# Altium PCB Ellis Huber Wearable device_IMU.PcbDoc
Units mm, origin at the board's own origin, x right, y up, seen from the top; angles counter-clockwise.
Board outline 22.5 x 12.5 mm, 4 copper layers (Top Layer, Ground, Power, Bottom Layer), stack 1.586 mm thick; 29 components, 22 nets, 78 pads, 26 vias.
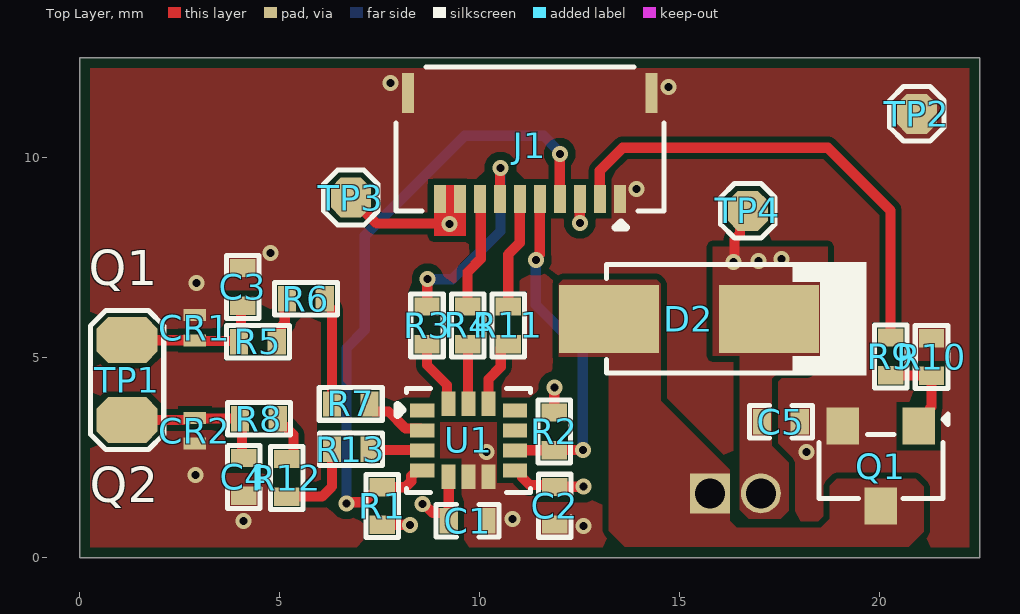
[diagram p0: Top Layer view]
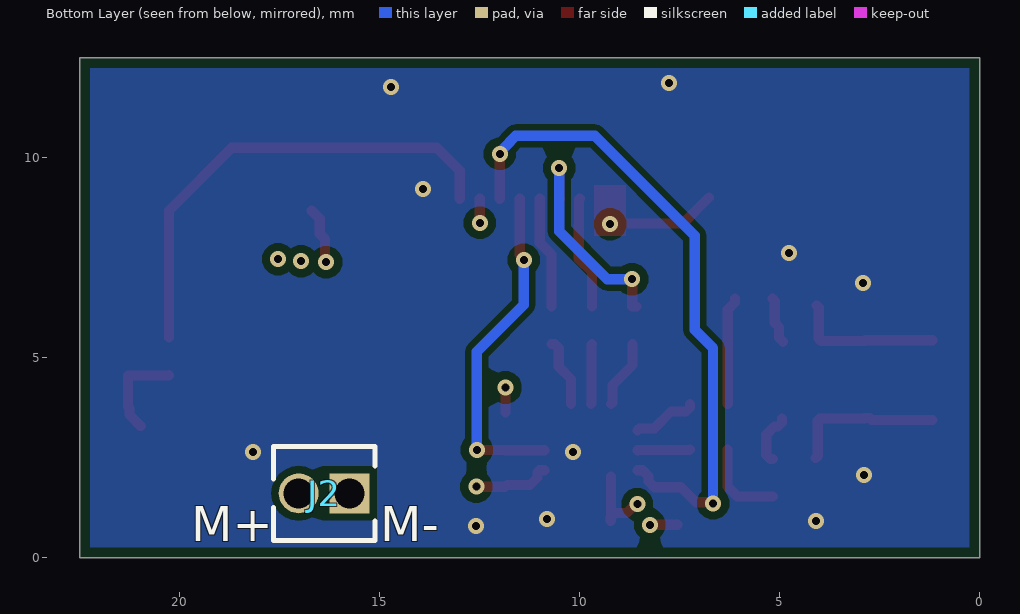
[diagram p1: Bottom Layer view, seen from below]
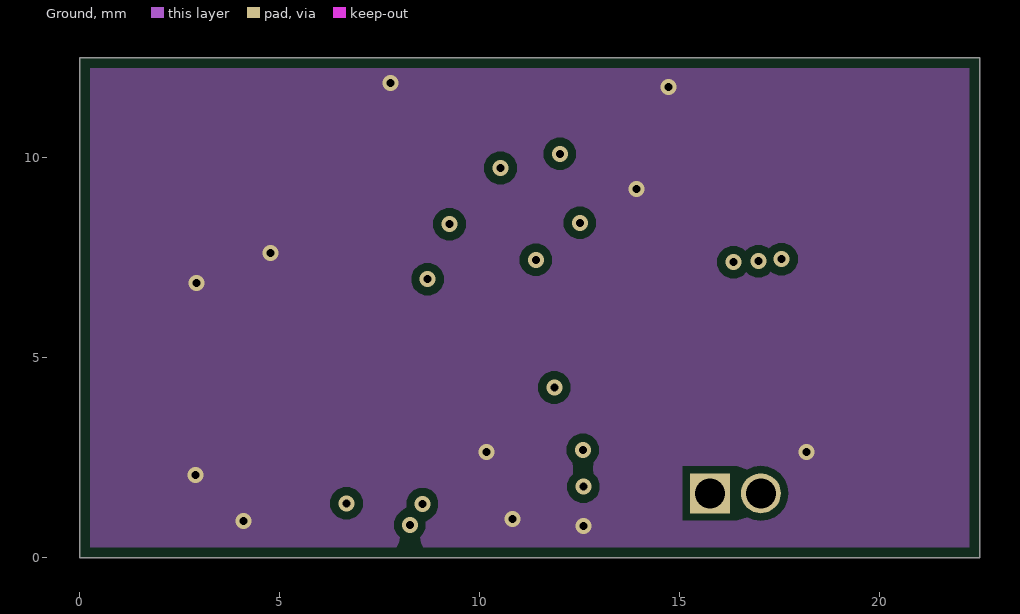
[diagram p2: Ground]
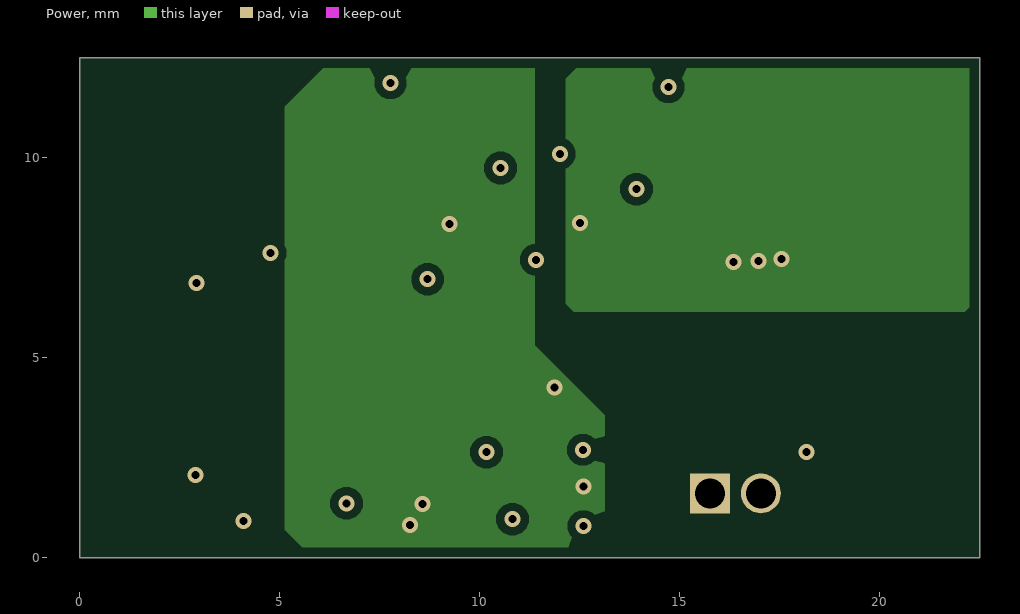
[diagram p3: Power]
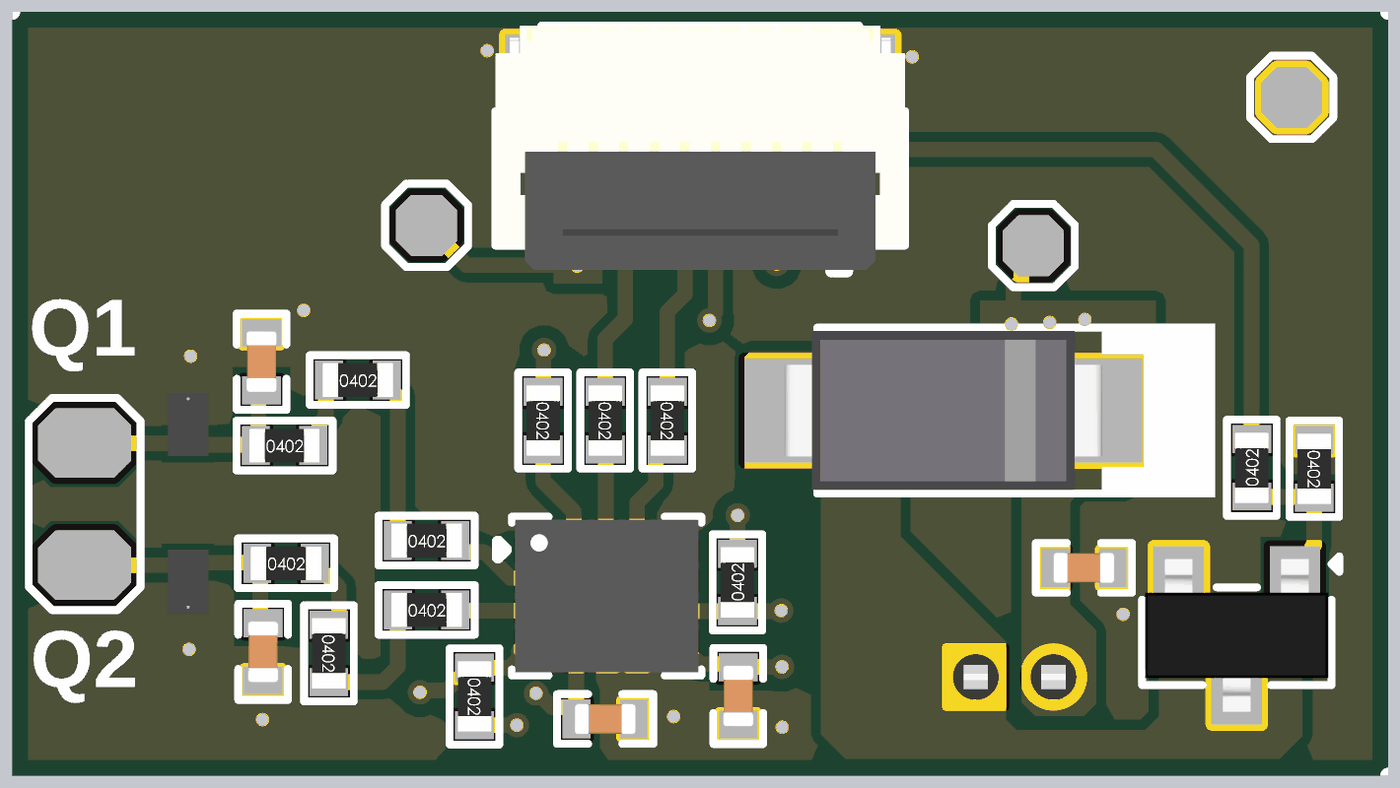
[diagram p4: 3D render of the assembled board from above, using the file's embedded part models]

## Layer stack, top to bottom
Top Solder: solder mask 0.0102, Solder Resist, Dk 3.5
Top Layer: signal copper 0.035
Dielectric 2: prepreg 0.2104, PP-006, Dk 4.4
Ground: signal copper 0.0152
Dielectric 1: dielectric 1.065, FR-4, Dk 4.6
Power: signal copper 0.0152
Dielectric 3: prepreg 0.2104, PP-006, Dk 4.4
Bottom Layer: signal copper 0.035
Bottom Solder: solder mask 0.0102, Solder Resist, Dk 3.5

## Board outline
0,0 0,12.5 22.5,12.5 22.5,0

## Design rules (kind name [scope] priority, off if disabled: settings)
BoardOutlineClearance [All] p1: gap=0 ignorepadtopadclearanceinfootprint=FALSE except(0.254: Fill-OutlineEdge Fill-CavityEdge Fill-CutoutEdge Fill-SplitBarrior Poly-OutlineEdge Poly-CavityEdge Poly-CutoutEdge Poly-SplitBarrior Region-OutlineEdge Region-CavityEdge Region-CutoutEdge Region-SplitBarrior)
Clearance [All] p1: gap=0.254 ignorepadtopadclearanceinfootprint=FALSE except(0: Arc-Hole Track-Hole SMDPad-Hole THPad-Hole Via-Hole Fill-Hole Poly-Hole Region-Hole Text-Hole; 0.127: Arc-SMDPad Arc-Text Track-SMDPad SMDPad-SMDPad SMDPad-Fill Via-Fill Region-Region Text-Text; 0.152: Arc-Arc Arc-Track Arc-Poly Track-Track Track-Poly SMDPad-Poly Fill-Poly Poly-Poly; 0.178: Arc-Via Arc-Region Track-Via Track-Fill SMDPad-Via THPad-Via THPad-Poly Via-Via; 0.203: Via-Poly)
MinimumSolderMaskSliver [All] p1: minsoldermaskwidth=0.025
PlaneConnect [All] p1: planeconnectstyle=Direct reliefexpansion=0.508 reliefentries=4 reliefconductorwidth=0.254 reliefairgap=0.254
PolygonConnect [All] p1: connectstyle=Direct reliefconductorwidth=0.254 reliefentries=4 polygonreliefangle="90 Angle" airgapwidth=0.254
RoutingVias [All] p1: holewidth=0.2 width=0.4 viastyle="Through Hole" minholewidth=0.2 minwidth=0.4 maxholewidth=0.2 maxwidth=0.4
SilkToSilkClearance [All] p1: silktosilkclearance=0
SilkToSolderMaskClearance [IsPad] p1: minsilkscreentomaskgap=0.003 clearancetoexposedcopper=TRUE
SolderMaskExpansion [All] p1: expansion=0.102 istentingtop=FALSE
SupplyNets "Schematic Supply Nets_2" [InNet('+3V3')] p1: voltage=0.000
SupplyNets "Schematic Supply Nets_1" [InNet('+3V3_M')] p2: voltage=0.000
SupplyNets "Schematic Supply Nets" [InNet('GND')] p3: voltage=0.000
Width [All] p1: maxlimit=0.254 minlimit=0.254 preferedwidth=0.254
26 further rules are at their usual default settings.

## Components (designator, comment, footprint, x,y, rotation, side; value= is the part's Value field where it differs from the comment)
C1 "0.1uF" Cap-0402 9.696,0.926 r0 top
C2 "0.1uF" Cap-0402 11.872,1.302 r270 top
C3 "100pF" Cap-0402 4.075,6.775 r270 top
C4 "100pF" Cap-0402 4.1,2.025 r90 top
C5 "0.1uF" Cap-0402 17.525,3.4 r180 top
CR1 "ESDALCL5-1BM2" CR_L5-1BM2_STM 2.875,5.75 r270 top
CR2 "ESDALCL5-1BM2" CR_L5-1BM2_STM 2.875,3.175 r90 top
D2 "SS24A" SMA 15.225,5.975 r180 top
J1 "503480-1000" 5034801000 11.25,10.3 r180 top
J2 "VL91022-160-320H" "HDR 1x2 Male 1.27mm" 16.392,1.612 r0 bottom
Q1 "AO3400A" sot-23 20.026,2.293 r180 top
R1 "10K" Res-0402 7.559,1.295 r270 top
R2 "10K" Res-0402 11.858,3.162 r90 top
R3 "0R" Res-0402 8.68,5.811 r270 top
R4 "0R" Res-0402 9.696,5.811 r270 top
R5 "200R" Res-0402 4.451,5.401 r0 top
R6 "200R" Res-0402 5.65,6.475 r0 top
R7 "100R" Res-0402 6.774,3.846 r0 top
R8 "200R" Res-0402 4.475,3.475 r0 top
R9 "100R" Res-0402 20.27,5.038 r90 top
R10 "100K" Res-0402 21.293,5.021 r270 top
R11 "0R" Res-0402 10.712,5.811 r270 top
R12 "200R" Res-0402 5.175,2 r270 top
R13 "100R" Res-0402 6.775,2.711 r0 top
TP1 "Qvar" "2 Test Pad" 1.183,3.444 r90 top
TP2 "TEST POINT 0.5mm Dia" "Test-point - 0.5mm" 20.925,11.1 r90 top
TP3 "TEST POINT 0.5mm Dia" "Test-point - 0.5mm" 6.775,9.007 r90 top
TP4 "TEST POINT 0.5mm Dia" "Test-point - 0.5mm" 16.7,8.675 r90 top
U1 "LSM6DSV16XTR" "14-LGA (2.5x3)" 9.719,2.938 r0 top

## Footprints (in the part's own frame and the unit in brackets; to place one, negate y for a bottom-side part, rotate by r counter-clockwise, add the part's x,y. Pads: shape width x height; smd on the part's side, far side on the other; paste and mask are expansions set on the pad)
"2 Test Pad" [mil]
  oct 45x60 smd: 1(0,0) 2(78.74,0)
  silkscreen extent -29,-36 108,36
"14-LGA (2.5x3)" [mm]
  rect 0.61x0.35 smd mask+0.05: 1(-1.16,0.75) 2(-1.16,0.25) 3(-1.16,-0.25) 4(-1.16,-0.75) 8(1.16,-0.75) 9(1.16,-0.25) 10(1.16,0.25) 11(1.16,0.75)
  rect 0.35x0.61 smd mask+0.05: 5(-0.5,-0.91) 6(0,-0.91) 7(0.5,-0.91) 12(0.5,0.91) 13(0,0.91) 14(-0.5,0.91)
  silkscreen extent -1.78,-1.3 1.55,1.3, body extent -1.5,-1.25 1.5,1.25, height 0.86
5034801000 [mm]
  rect 0.3x0.7 smd: 1(-2.25,1.325) 2(-1.75,1.325) 3(-1.25,1.325) 4(-0.75,1.325) 5(-0.25,1.325) 6(0.25,1.325) 7(0.75,1.325) 8(1.25,1.325) 9(1.75,1.325) 10(2.25,1.325)
  rect 0.3x1 smd: S1(-3.04,-1.325) S2(3.04,-1.325)
  silkscreen extent -3.35,-1.97 3.35,2.04, body extent -3.35,-1.98 3.35,2.02, height 1.02
Cap-0402 [mil]
  rect 18x25 smd mask+2.36: 1(-18.5,0) 2(18.5,0)
  silkscreen extent -31,-16 31,16, body extent -20,-10 20,10, height 19
CR_L5-1BM2_STM [mil]
  rect 12x22 smd paste+0 mask+0: 1(-12.5,0)
  rect 12x22 smd paste+0 mask-1: 2(12.5,0)
  body extent -21,-13 21,13, height 20
"HDR 1x2 Male 1.27mm" [mm]
  rect 1x1 hole 0.75 paste-2539.97 mask+0.051: 1(-0.635,0)
  round 1 hole 0.75 paste-2539.97 mask+0.051: 2(0.635,0)
  silkscreen extent -1.27,-1.18 1.27,1.18, body extent -1.27,-1.17 1.28,1.17, height 5.6
Res-0402 [mil]
  rect 18x25 smd mask+2.17: 1(-18.5,0) 2(18.5,0)
  silkscreen extent -32,-17 32,16, body extent -23,-11 23,11, height 16
SMA [mm]
  rect 2.5x1.7 smd: 1(-2,0) 2(2,0)
  silkscreen extent -4.45,-1.42 2.06,1.42, body extent -2.6,-1.3 2.6,1.3, height 2.4
sot-23 [mm] "TRANS NPN 40V 0.6A SOT23"
  rect 0.82x0.92 smd: 1(-0.95,-1) 2(0.95,-1) 3(0,1)
  silkscreen extent -1.68,-1.3 1.55,0.81, body extent -1.5,-1.25 1.5,1.25, height 1.05
"Test-point - 0.5mm" [mm]
  oct 1x1 smd: 1(0,0)
  silkscreen extent -0.68,-0.68 0.68,0.68

## Part data
C1 C2 C5: library part C1005X5R1H104K050BB, "CAP CER 0.1UF 50V X5R 0402", Capacitance=100nF, Case Code (Imperial)=0402, Case Code (Metric)=1005, Dielectric=X5R, Dielectric Material=Ceramic, LCSC Part Number=C2181865, Manufacturer=TDK, Max Operating Temperature=85°C, Min Operating Temperature=-55°C, Package Quantity=1, Supplier Part Number 1=445-5942-1-ND, Tolerance=10%, Voltage=50V, Case/Package=0402, ComponentLink1Description=https://product.tdk.com/info/en/catalog/spec/mlccspec_commercial_general_midvoltage_en.pdf?src-supplier=Digi-Key, ComponentLink1URL=https://product.tdk.com/info/en/catalog/spec/mlccspec_commercial_general_midvoltage_en.pdf?src-supplier=Digi-Key, ComponentLink2Description=http://www.tdk.co.jp/tefe02/e413_c.pdf?src-supplier=Future+Electronics, ComponentLink2URL=http://www.tdk.co.jp/tefe02/e413_c.pdf?src-supplier=Future+Electronics, ComponentLink3Description=https://www.verical.com/server-webapp/html/getDatasheet?partID=743571&src-supplier=Verical, ComponentLink3URL=https://www.verical.com/server-webapp/html/getDatasheet?partID=743571&src-supplier=Verical, ComponentLink4Description=http://www.tdk.co.jp/tefe02/e412_c.pdf?src-supplier=Avnet+Europe, ComponentLink4URL=http://www.tdk.co.jp/tefe02/e412_c.pdf?src-supplier=Avnet+Europe, Construction=Flat, Depth=0.5mm, Height=0.5mm, Item Type=Capacitor, Lead Free="Lead Free", Length=1mm, Manufacturer Part Number=C1005X5R1H104K050BB, Mount="Surface Mount", Packaging="Tape and Reel", Pricing 1="1=0.12, 10=0.09, 50=0.049, 100=0.04, 500=0.02858, 1000=0.02245, 2500=0.02041, 5000=0.01878 (USD)", Radiation Hardening=No, REACH SVHC="No SVHC", Resistor Type=Ceramic, RoHS Compliant=Yes, Series=C, Stock 1=1455182, Supplier 1=Digi-Key, Termination=SMD/SMT, Thickness=0.022inch, Voltage Rating=50V, Voltage Rating (DC)=50V, Weight=2.3E-05oz, Width=0.02inch
C3 C4: library part CC0402JRNPO9BN101, "CAP CER 100PF 50V C0G/NPO 0402", Case Code (Imperial)=0402, Case Code (Metric)=1005, Dielectric=C0G, Dielectric Material=Ceramic, Insulation Resistance=100GR, LCSC Part Number=C106200, Manufacturer=Yageo, Max Operating Temperature=125°C, Min Operating Temperature=-55°C, Package Quantity=1, Supplier Part Number=8934564, Temperature Coefficient=30ppm/°C, Tolerance=5%, Voltage=50V, Case/Package=0402, Category="Ceramic Capacitors", ComponentLink1Description=https://datasheet.ciiva.com/11786/0900766b80d84fbf-11786101.pdf?src-supplier=Rs, ComponentLink1URL=https://datasheet.ciiva.com/11786/0900766b80d84fbf-11786101.pdf?src-supplier=Rs, ComponentLink2Description=https://datasheet.ciiva.com/23767/25787-23767888.pdf?src-supplier=Newark, ComponentLink2URL=https://datasheet.ciiva.com/23767/25787-23767888.pdf?src-supplier=Newark, ComponentLink3Description=https://datasheet.ciiva.com/28450/1443161-28450220.pdf?src-supplier=Element14, ComponentLink3URL=https://datasheet.ciiva.com/28450/1443161-28450220.pdf?src-supplier=Element14, ComponentLink4Description=https://datasheet.ciiva.com/8033/1443161-8033598.pdf?src-supplier=Element14, ComponentLink4URL=https://datasheet.ciiva.com/8033/1443161-8033598.pdf?src-supplier=Element14, ComponentLink5Description=https://datasheet.ciiva.com/143/mlccorderingcode-143990.pdf?src-supplier=Digi-Key, ComponentLink5URL=https://datasheet.ciiva.com/143/mlccorderingcode-143990.pdf?src-supplier=Digi-Key, ComponentLink6Description=https://datasheet.ciiva.com/143/mlccorderingcode-143989.pdf?src-supplier=Digi-Key, ComponentLink6URL=https://datasheet.ciiva.com/143/mlccorderingcode-143989.pdf?src-supplier=Digi-Key, ComponentLink7Description=https://datasheet.ciiva.com/143/mlccorderingcode-143991.pdf?src-supplier=Digi-Key, ComponentLink7URL=https://datasheet.ciiva.com/143/mlccorderingcode-143991.pdf?src-supplier=Digi-Key, Depth=0.5mm, Height=0.5mm, Item Type=Capacitor, Lead Free="Lead Free", Length=1mm, Manufacturer Part Number=CC0402JRNPO9BN101, Mounting Technology="Surface Mount", Packaging="Tape and Reel", Pins=2, Pricing="10000=0.002, 40000=0.0019, 150000=0.0018, 400000=0.0018, 1000000=0.0017 (USD)", Radiation Hardening=No, Reach SVHC Compliant=No, RoHS=Yes, RoHS Compliant=Yes, Series=CC, Stock=11720000, Supplier="Future Electronics", Termination=SMD/SMT, Thickness=0.022inch, Voltage Rating=50V, Voltage Rating (DC)=50V, Width=0.02inch
CR1 CR2: "Single-line low capacitance and low leakage current ESD protection", Manufacturer_Name=STMicroelectronics, Copyright="Copyright (C) 2025 Ultra Librarian. All rights reserved.", Manufacturer_Part_Number=ESDALCL5-1BM2, RefDes=RefDes, Type=Type
D2: "40V 500mV@2A 2A SMA(DO-214AC) Schottky Barrier Diodes (SBD) ROHS", LCSC Part Number=C2886579, Manufacturer="Guangdong Hottech", Package=SMA(DO-214AC), ComponentLink1Description=LCSC, ComponentLink1URL=https://www.lcsc.com/product-detail/Schottky-Barrier-Diodes-SBD_Guangdong-Hottech-SS24A_C2886579.html, Manufacturer Part Number=SS24A
J1: "CONN FFC FPC 10POS 0.5MM R/A", Actuator Color=Black, Current Rating=500mA, Flammability Rating="UL94 V-0", Housing Color=White, Manufacturer=Molex, Max Operating Temperature=85°C, Max Voltage Rating (AC)=50V, Min Operating Temperature=-40°C, Package Quantity=3000, Supplier Part Number=538-503480-1000, Actuator Material=Nylon,Glass,Polyamide, ComponentLink1Description=https://datasheet.ciiva.com/26916/getdatasheetpartid-735332-26916946.pdf?src-supplier=Verical, ComponentLink1URL=https://datasheet.ciiva.com/26916/getdatasheetpartid-735332-26916946.pdf?src-supplier=Verical, ComponentLink2Description=https://datasheet.ciiva.com/5137/5034801000-ffc-fpc-connectors-179433-5137762.pdf?src-supplier=Mouser, ComponentLink2URL=https://datasheet.ciiva.com/5137/5034801000-ffc-fpc-connectors-179433-5137762.pdf?src-supplier=Mouser, ComponentLink3Description=https://datasheet.ciiva.com/671/5034801000-sd-671179.pdf?src-supplier=Digikey, ComponentLink3URL=https://datasheet.ciiva.com/671/5034801000-sd-671179.pdf?src-supplier=Digikey, Contact Material=Bronze, Contact Plating=Gold, Depth=3.6mm, ELV=5681ELVCompliant, Gender=Receptacle, Halogen Free=5696HalogenFree, Housing Material=Polymer, Item Type="FFC / FPC", Length=6.7mm, Manufacturer Part Number=503480-1000, Material=150ConductorMaterial, Mating Cycles=10, Max Voltage Rating (DC)=50V, Number of Circuits=10, Number of Contacts=10, Number of Positions=10, Number of Rows=1, Orientation="Right Angle", Packaging="Tape and Reel", Pitch=0.5mm, Plating=157ConductorMaterial, Pricing="1=0.99, 10=0.737, 50=0.737, 100=0.64, 1000=0.559, 10000=0.465 (USD)", Radiation Hardening=No, Reach SVHC Compliant=Unknown, RoHS=Yes, Series="BackFlip, Easy-On 503480", Stackable=No, Stock=11378, Supplier=Mouser, Termination=Solder, Voltage Rating=50V, Voltage Rating (AC)=50V, Wire/Cable Type=Straight
J2: library part 1.27-1*2P, "3A Direct Insert Policy 1.7mm 2P 3mm -55℃~+105℃ 2.5mm 1.27mm Single Row Black Brass 1x2P Plugin,P=1.27mm Pin Headers ROHS", LCSC Part Number=C703015, Manufacturer="BOOMELE(BOOM Precision Elec)", Package=Plugin,P=1.27mm, ComponentLink1Description=LCSC, ComponentLink1URL=https://www.lcsc.com/product-detail/Pin-Headers_BOOMELE-Boom-Precision-Elec-1-27-1-2P_C703015.html, Item Type=Male, Manufacturer Part Number=1.27-1*2P
Q1: "30V 5.8A 32mΩ@10V,5.8A 1.4W 1.4V@250uA N Channel SOT-23 MOSFETs ROHS", LCSC Part Number=C344010, Manufacturer=BORN, ComponentLink1Description=LCSC, ComponentLink1URL=https://www.lcsc.com/product-detail/MOSFETs_BORN-AO3400A_C344010.html, Item Type=Mosfet, Manufacturer Part Number=AO3400A
R1 R2: library part RC0402FR-0710KL, "RES 10K OHM 1% 1/16W 0402", Case Code (Imperial)=0402, Case Code (Metric)=1005, LCSC Part Number=C60490, Manufacturer=Yageo, Max Operating Temperature=155°C, Max Power Dissipation=63mW, Min Operating Temperature=-55°C, Power Rating=62.5mW, Resistance=10kR, Resistance Tolerance=1%, Resistor Type="Thick Film", Supplier Part Number 1=603-RC0402FR-0710KL, Temperature Coefficient=100ppm/°C, Voltage Rating=50V, Case/Package=0402, Category="Chip SMD Resistors", ComponentLink1Description=https://datasheet.ciiva.com/7660/38568-7660787.pdf?src-supplier=Element14, ComponentLink1URL=https://datasheet.ciiva.com/7660/38568-7660787.pdf?src-supplier=Element14, ComponentLink2Description=https://datasheet.ciiva.com/7849/1686128-7849814.pdf?src-supplier=Element14, ComponentLink2URL=https://datasheet.ciiva.com/7849/1686128-7849814.pdf?src-supplier=Element14, ComponentLink3Description=https://datasheet.ciiva.com/7983/1018594-7983486.pdf?src-supplier=Element14, ComponentLink3URL=https://datasheet.ciiva.com/7983/1018594-7983486.pdf?src-supplier=Element14, ComponentLink4Description=https://datasheet.ciiva.com/22747/1018594-22747512.pdf?src-supplier=Element14, ComponentLink4URL=https://datasheet.ciiva.com/22747/1018594-22747512.pdf?src-supplier=Element14, ComponentLink5Description=https://datasheet.ciiva.com/12667/pyu-rc0402-51-rohs-l-6-r-12667067.pdf?src-supplier=Mouser, ComponentLink5URL=https://datasheet.ciiva.com/12667/pyu-rc0402-51-rohs-l-6-r-12667067.pdf?src-supplier=Mouser, ComponentLink6Description=https://datasheet.ciiva.com/7849/1784430-7849813.pdf?src-supplier=Element14, ComponentLink6URL=https://datasheet.ciiva.com/7849/1784430-7849813.pdf?src-supplier=Element14, ComponentLink7Description=https://datasheet.ciiva.com/7849/1784430-7849815.pdf?src-supplier=Element14, ComponentLink7URL=https://datasheet.ciiva.com/7849/1784430-7849815.pdf?src-supplier=Element14, Construction=Rectangular, Depth=0.5mm, Features="Moisture Resistant", Height=0.32mm, Item Type=Resistor, Lead Free="Lead Free", Lead Pitch=0.2mm, Length=1mm, Manufacturer Part Number=RC0402FR-0710KL, Military Standard=Not, Number of Pins=2, Number of Terminations=2, Packaging="Tape and Reel", Pricing 1="1=0.10000, 10=0.01400, 50=0.01400, 100=0.00500, 1000=0.00300, 10000=0.00200 (USD)", REACH SVHC="No SVHC", RoHS=Yes, RoHS Compliant=Yes, Series=RC, Stock 1=18648329, Supplier 1=Mouser, Termination=SMD/SMT, Tolerance=1%, Voltage Rating (DC)=50V, Width=0.5mm, Working Voltage=50V
R3 R4 R11: library part RC0402FR-070RL, "RES 0 OHM JUMPER 1/16W 0402", Case Code (Imperial)=0402, Case Code (Metric)=1005, LCSC Part Number=C106231, Manufacturer=Yageo, Max Operating Temperature=155°C, Max Power Dissipation=63mW, Min Operating Temperature=-55°C, Power Rating=62.5mW, Resistor Type="Thick Film", Supplier Part Number 1=603-RC0402FR-070RL, Temperature Coefficient=200ppm/°C, Tolerance=1%, Voltage Rating=50V, Case/Package=0402, ComponentLink1Description=https://datasheet.ciiva.com/8896/pyu-rc0402-51-rohs-l-6-8896149.pdf?src-supplier=Avnet, ComponentLink1URL=https://datasheet.ciiva.com/8896/pyu-rc0402-51-rohs-l-6-8896149.pdf?src-supplier=Avnet, ComponentLink2Description=https://datasheet.ciiva.com/16790/pyu-rc0402-51-rohs-l-6-r-16790444.pdf?src-supplier=Future+Electronics, ComponentLink2URL=https://datasheet.ciiva.com/16790/pyu-rc0402-51-rohs-l-6-r-16790444.pdf?src-supplier=Future+Electronics, Contact Plating=Tin,Matte, Features="Moisture Resistant", Height=0.35mm, Item Type=Resistors, Lead Free="Lead Free", Length=1mm, Manufacturer Part Number=RC0402FR-070RL, Mount="Surface Mount", Number of Terminations=2, Packaging="Tape and Reel", Pricing 1="1=0.10000, 10=0.01400, 50=0.01400, 100=0.00600, 1000=0.00300, 5000=0.00200, 10000=0.00100 (USD)", Radiation Hardening=No, Resistance=0R, RoHS=Yes, RoHS Compliant=Yes, Series=RC, Size Code=0402, Stock 1=8556842, Supplier 1=Mouser, Termination=SMD/SMT, Width=0.5mm
R5 R6 R8 R12: library part RC0402FR-07200RL, "RES 200 OHM 1% 1/16W 0402", Case Code (Imperial)=0402, Case Code (Metric)=1005, LCSC Part Number=C114764, Manufacturer=Yageo, Max Operating Temperature=155°C, Max Power Dissipation=63mW, Min Operating Temperature=-55°C, Package Quantity=1, Resistance Tolerance=1%, Resistor Type="Thick Film", Supplier Part Number 1=311-200LRCT-ND, Temperature Coefficient=100ppm/°C, Voltage Rating=50V, Case/Package=0402, Category="Chip SMD Resistors", ComponentLink1Description=https://datasheet.ciiva.com/2553/pyu-r-int-thick-7-2553232.pdf?src-supplier=Digi-Key, ComponentLink1URL=https://datasheet.ciiva.com/2553/pyu-r-int-thick-7-2553232.pdf?src-supplier=Digi-Key, ComponentLink2Description=https://datasheet.ciiva.com/7983/1018594-7983509.pdf?src-supplier=Element14, ComponentLink2URL=https://datasheet.ciiva.com/7983/1018594-7983509.pdf?src-supplier=Element14, ComponentLink3Description=https://datasheet.ciiva.com/16804/pyu-rc0402-51-rohs-l-6-r-16804406.pdf?src-supplier=Future+Electronics, ComponentLink3URL=https://datasheet.ciiva.com/16804/pyu-rc0402-51-rohs-l-6-r-16804406.pdf?src-supplier=Future+Electronics, ComponentLink4Description=https://datasheet.ciiva.com/15189/getdatasheetpartid-331152-15189383.pdf?src-supplier=Verical, ComponentLink4URL=https://datasheet.ciiva.com/15189/getdatasheetpartid-331152-15189383.pdf?src-supplier=Verical, ComponentLink5Description=https://datasheet.ciiva.com/7849/1018594-7849898.pdf?src-supplier=Element14, ComponentLink5URL=https://datasheet.ciiva.com/7849/1018594-7849898.pdf?src-supplier=Element14, ComponentLink6Description=https://datasheet.ciiva.com/5562/pyu-rc0402-51-rohs-l-6-r-8721-5562539.pdf?src-supplier=Mouser, ComponentLink6URL=https://datasheet.ciiva.com/5562/pyu-rc0402-51-rohs-l-6-r-8721-5562539.pdf?src-supplier=Mouser, ComponentLink7Description=https://datasheet.ciiva.com/7849/1018594-7849899.pdf?src-supplier=Element14, ComponentLink7URL=https://datasheet.ciiva.com/7849/1018594-7849899.pdf?src-supplier=Element14, ComponentLink8Description=https://datasheet.ciiva.com/2553/pyu-r-int-thick-7-2553230.pdf?src-supplier=Digi-Key, ComponentLink8URL=https://datasheet.ciiva.com/2553/pyu-r-int-thick-7-2553230.pdf?src-supplier=Digi-Key, ComponentLink9Description=https://datasheet.ciiva.com/2553/pyu-r-int-thick-7-2553231.pdf?src-supplier=Digi-Key, ComponentLink9URL=https://datasheet.ciiva.com/2553/pyu-r-int-thick-7-2553231.pdf?src-supplier=Digi-Key, Construction=Rectangular, Depth=0.5mm, Features="Moisture Resistant", Height=0.016inch, Lead Free="Lead Free", Length=1mm, Manufacturer Part Number=RC0402FR-07200RL, Military Standard=Not, Number of Terminations=2, Packaging="Tape and Reel", Power Rating=63mW, Pricing 1="1=0.10000, 10=0.01600, 100=0.00660, 1000=0.00299, 2500=0.00259, 5000=0.00214 (USD)", REACH SVHC="No SVHC", Resistance=200R, RoHS=Yes, RoHS Compliant=Yes, Series=RC, Size Code=0402, Stock 1=19778, Supplier 1=Digi-Key, Termination=SMD/SMT, Tolerance=1%, Voltage Rating (DC)=50V, Width=0.02inch
R7 R9 R13: library part RC0402FR-07100RL, "RES 100 OHM 1% 1/16W 0402", Case Code (Imperial)=0402, Case Code (Metric)=1005, LCSC Part Number=C106232, Manufacturer=Yageo, Max Operating Temperature=155°C, Max Power Dissipation=63mW, Min Operating Temperature=-55°C, Power Rating=62.5mW, Resistance Tolerance=1%, Resistor Type="Thick Film", Supplier Part Number 1=603-RC0402FR-07100RL, Temperature Coefficient=100ppm/°C, Voltage Rating=50V, Case/Package=0402, Category="Chip SMD Resistors", ComponentLink1Description=https://datasheet.ciiva.com/11808/0900766b80c66297-11808765.pdf?src-supplier=RSComponents, ComponentLink1URL=https://datasheet.ciiva.com/11808/0900766b80c66297-11808765.pdf?src-supplier=RSComponents, ComponentLink2Description=https://datasheet.ciiva.com/7849/1784430-7849810.pdf?src-supplier=Element14, ComponentLink2URL=https://datasheet.ciiva.com/7849/1784430-7849810.pdf?src-supplier=Element14, ComponentLink3Description=https://datasheet.ciiva.com/28367/1018594-28367226.pdf?src-supplier=Element14, ComponentLink3URL=https://datasheet.ciiva.com/28367/1018594-28367226.pdf?src-supplier=Element14, ComponentLink4Description=https://datasheet.ciiva.com/22747/1018594-22747511.pdf?src-supplier=Element14, ComponentLink4URL=https://datasheet.ciiva.com/22747/1018594-22747511.pdf?src-supplier=Element14, ComponentLink5Description=https://datasheet.ciiva.com/12667/pyu-rc0402-51-rohs-l-6-r-12667957.pdf?src-supplier=Mouser, ComponentLink5URL=https://datasheet.ciiva.com/12667/pyu-rc0402-51-rohs-l-6-r-12667957.pdf?src-supplier=Mouser, ComponentLink6Description=https://datasheet.ciiva.com/15189/getdatasheetpartid-329466-15189335.pdf?src-supplier=Verical, ComponentLink6URL=https://datasheet.ciiva.com/15189/getdatasheetpartid-329466-15189335.pdf?src-supplier=Verical, ComponentLink7Description=https://datasheet.ciiva.com/16740/pyu-rc0402-51-rohs-l-6-r-16740566.pdf?src-supplier=Future+Electronics, ComponentLink7URL=https://datasheet.ciiva.com/16740/pyu-rc0402-51-rohs-l-6-r-16740566.pdf?src-supplier=Future+Electronics, Construction=Rectangular, Depth=0.5mm, Features="Moisture Resistant", Height=0.32mm, Item Type=Resistor, Lead Free="Lead Free", Length=1mm, Manufacturer Part Number=RC0402FR-07100RL, Military Standard=Not, Number of Pins=2, Number of Terminations=2, Packaging="Tape and Reel", Pricing 1="1=0.10000, 10=0.01200, 50=0.01200, 100=0.00500, 1000=0.00300, 2500=0.00200, 10000=0.00100 (USD)", REACH SVHC="No SVHC", Resistance=100R, RoHS=Yes, RoHS Compliant=Yes, Series=RC, Size Code=0402, Stock 1=699545, Supplier 1=Mouser, Technology="THICK FILM", Termination=SMD/SMT, Tolerance=1%, Voltage Rating (DC)=50V, Width=0.5mm
R10: library part RC0402FR-07100KL, "RES 100K OHM 1% 1/16W 0402", Case Code (Imperial)=0402, Case Code (Metric)=1005, LCSC Part Number=C60491, Manufacturer=Yageo, Max Operating Temperature=155°C, Max Power Dissipation=63mW, Min Operating Temperature=-55°C, Package Quantity=1, Resistance=100kR, Resistance Tolerance=1%, Resistor Type="Thick Film", Supplier Part Number 1=603-RC0402FR-07100KL, Temperature Coefficient=100ppm/°C, Voltage Rating=50V, Case/Package=0402, Category="Chip SMD Resistors", ComponentLink1Description=https://datasheet.ciiva.com/11819/0900766b80c66297-11819452.pdf?src-supplier=RSComponents, ComponentLink1URL=https://datasheet.ciiva.com/11819/0900766b80c66297-11819452.pdf?src-supplier=RSComponents, ComponentLink2Description=https://datasheet.ciiva.com/22747/1018594-22747509.pdf?src-supplier=Element14, ComponentLink2URL=https://datasheet.ciiva.com/22747/1018594-22747509.pdf?src-supplier=Element14, ComponentLink3Description=https://datasheet.ciiva.com/2453/pyu-r-int-thick-7-2453362.pdf?src-supplier=Digi-Key, ComponentLink3URL=https://datasheet.ciiva.com/2453/pyu-r-int-thick-7-2453362.pdf?src-supplier=Digi-Key, ComponentLink4Description=https://datasheet.ciiva.com/2453/pyu-r-int-thick-7-2453363.pdf?src-supplier=Digi-Key, ComponentLink4URL=https://datasheet.ciiva.com/2453/pyu-r-int-thick-7-2453363.pdf?src-supplier=Digi-Key, ComponentLink5Description=https://datasheet.ciiva.com/2453/pyu-r-int-thick-7-2453361.pdf?src-supplier=Digi-Key, ComponentLink5URL=https://datasheet.ciiva.com/2453/pyu-r-int-thick-7-2453361.pdf?src-supplier=Digi-Key, ComponentLink6Description=https://datasheet.ciiva.com/12667/pyu-rc0402-51-rohs-l-6-r-12667930.pdf?src-supplier=Mouser, ComponentLink6URL=https://datasheet.ciiva.com/12667/pyu-rc0402-51-rohs-l-6-r-12667930.pdf?src-supplier=Mouser, ComponentLink7Description=https://datasheet.ciiva.com/15189/getdatasheetpartid-323696-15189334.pdf?src-supplier=Verical, ComponentLink7URL=https://datasheet.ciiva.com/15189/getdatasheetpartid-323696-15189334.pdf?src-supplier=Verical, Construction=Rectangular, Depth=0.5mm, Features="Moisture Resistant", Height=0.016inch, Item Type=Resistor, Lead Free="Lead Free", Length=0.039inch, Manufacturer Part Number=RC0402FR-07100KL, Military Standard=Not, Number of Terminations=2, Packaging="Tape and Reel", Power Rating=63mW, Pricing 1="1=0.10000, 10=0.01200, 50=0.01200, 100=0.00500, 1000=0.00300, 2500=0.00200, 10000=0.00100 (USD)", REACH SVHC="No SVHC", RoHS=Yes, RoHS Compliant=Yes, Series=RC, Stock 1=7759549, Supplier 1=Mouser, Technology="THICK FILM", Termination=SMD/SMT, Tolerance=1%, Width=0.02inch, Working Voltage=50V
TP1: library part "2 Test Pad", "Wire Connecting Pad", Item Type="Test Point", Manufacturer Part Number="2 Test Pad"
TP2 TP3 TP4: "Test Point ON", Item Type="Test Point", Manufacturer Part Number="TEST POINT 0.5mm Dia"
U1: "INEMO 3D ACCELEROMETER AND 3D GY", LCSC Part Number=C5267406, Manufacturer=STMicroelectronics, Max Operating Temperature=85°C, Max Supply Voltage=3.6V, Min Operating Temperature=-40°C, Min Supply Voltage=1.71V, Height=860um, Item Type=IC, Manufacturer Part Number=LSM6DSV16XTR, Pricing="5000=2.815 (USD)", RoHS=No, Stock=5000, Supplier=DigiKey

## Via types
v1: diameter 0.4, hole 0.2, Top Layer to Bottom Layer, tented both sides, 26 vias

## Nets (pads, with @x,y where several pads share a name; then routed paths per layer and width w, separated by ;. In a path a pad name is that pad's centre, name@x,y a point inside that pad or via, vN(x,y) a via of type N, cw(c..) or ccw(c..) an arc to the next point about the centre after c; other vN are vias at no path point)
+3V3: C1.1 C2.1 J1.9 J1.10 R1.2 R2.2 TP3.1 U1.5 U1.8 | length 7.8
  Top Layer w0.254: TP3.1 7.426,8.356 9.225,8.356 v1(9.24,8.341) ; R1.2 v1(8.25,0.825) ; v1(8.564,1.346) 8.603,1.346 8.832,1.117 9.124,1.117 9.226,1.015 C1.1 ; U1.5 9.222,2.024 C1.1@9.222,1.117 ; U1.8 11.009,2.188 11.057,2.14 11.057,2.01 11.245,1.822 11.822,1.822 C2.1 11.874,1.775 12.586,1.775 v1(12.588,1.778) ; R2.2 11.86,3.633 11.86,4.258 v1(11.861,4.26)
+3V3_M: C5.2 D2.1 J1.3 J2.2 TP4.1 | length 2
  Top Layer w0.254: v1(12.5,8.375) J1.3 ; v1(16.34,7.391) 16.368,7.419 16.368,7.966 16.503,8.1 16.503,8.478 TP4.1
  other v1: 16.965,7.416 17.54,7.466
CS: J1.6 R11.1 | length 2.8
  Top Layer w0.254: R11.1 10.712,7.587 11,7.875 J1.6
GND: C1.2 C2.2 C3.1 C4.1 C5.1 CR1.1 CR2.1 J1.1 J1.S1 J1.S2 Q1.2 R10.1 TP2.1 U1.6 U1.7
  other v1: 12.59,0.791 4.09,0.916 10.815,0.966 2.89,2.066 10.165,2.641 18.165,2.641 2.915,6.866 4.765,7.616 13.915,9.216 14.715,11.766 7.765,11.866
MC3: J1.2 R9.2 | length 12
  Top Layer w0.254: J1.2 13,9.675 13.575,10.25 18.7,10.25 20.27,8.68 R9.2
NetC3_2: C3.2 CR1.2 R5.1 TP1.2 | length 3.7
  Top Layer w0.254: TP1.2 1.189,5.438 2.869,5.438 CR1.2 2.891,5.417 3.965,5.417 4.028,5.48 4.028,6.258 C3.2
NetC4_2: C4.2 CR2.2 R8.1 TP1.1 | length 3.9
  Top Layer w0.254: TP1.1 2.7,3.444 2.748,3.492 CR2.2 2.884,3.484 3.996,3.484 R8.1 4.053,3.428 4.053,2.542 C4.2
NetD2_2: D2.2 J2.1 Q1.3
NetJ1_4: J1.4 R1.1 U1.4 | length 16.4
  Top Layer w0.254: v1(6.667,1.363) 6.695,1.391 7.096,1.391 7.47,1.765 R1.1 8.136,1.765 8.285,1.913 8.285,2.043 8.429,2.188 U1.4 ; J1.4 v1(12,10.1)
  Bottom Layer w0.254: v1(6.667,1.363) 6.667,5.242 7.125,5.7 7.125,8.05 9.625,10.55 11.601,10.55 11.75,10.401 11.75,10.39 12,10.14 v1(12,10.1)
NetJ1_5: J1.5 R2.1 U1.9 | length 8.5
  Top Layer w0.254: U1.9 10.881,2.69 11.856,2.69 R2.1 12.567,2.692 v1(12.575,2.7) ; v1(11.4,7.45) 11.4,7.49 11.5,7.59 J1.5
  Bottom Layer w0.254: v1(11.4,7.45) 11.4,6.325 12.575,5.15 v1(12.575,2.7)
NetQ1_1: Q1.1 R9.1 R10.2 | length 2.4
  Top Layer w0.254: R9.1 20.278,4.56 21.285,4.56 R10.2 21.293,3.775 21.259,3.74 21.259,3.576 Q1.1
NetR3_2: R3.2 U1.14 | length 1.7
  Top Layer w0.254: R3.2 8.68,4.82 9.18,4.32 9.18,3.886 U1.14
NetR4_2: R4.2 U1.13 | length 1.5
  Top Layer w0.254: R4.2 9.707,5.33 9.707,3.859 U1.13
NetR5_2: R5.2 R6.1 | length 1.2
  Top Layer w0.254: R5.2 5.022,5.503 5.022,5.772 5.125,5.875 5.125,6.42 R6.1
NetR6_2: R6.2 R7.1 | length 2.7
  Top Layer w0.254: R6.2 6.12,6.386 6.304,6.202 R7.1
NetR7_2: R7.2 U1.2 | length 1.6
  Top Layer w0.254: R7.2 7.243,3.758 7.345,3.656 7.719,3.656 8.139,3.236 8.511,3.236 U1.2
NetR8_2: R8.2 R12.1 | length 1.3
  Top Layer w0.254: R8.2 4.945,3.386 5.046,3.284 5.135,3.284 5.339,3.081 5.339,2.572 5.238,2.47 R12.1
NetR11_2: R11.2 U1.12 | length 1.7
  Top Layer w0.254: U1.12 10.219,4.469 10.525,4.775 10.525,5.24 10.627,5.341 R11.2
NetR12_2: R12.2 R13.1 | length 2.2
  Top Layer w0.254: R12.2 6.055,1.53 6.305,1.78 R13.1
NetR13_2: R13.2 U1.3 | length 1.3
  Top Layer w0.254: R13.2 7.256,2.699 8.548,2.699 U1.3
SCL: J1.8 R4.1 | length 2.8
  Top Layer w0.254: R4.1 9.696,7.146 10.025,7.475 10.025,8.3 10.023,8.302 10.023,8.952 J1.8
SDA: J1.7 R3.1 | length 5.5
  Top Layer w0.254: R3.1@8.591,6.281 R3.1 8.688,6.289 8.688,6.957 v1(8.696,6.965) ; v1@8.675,7 8.68,6.995 v1@8.68,6.965 ; J1.7 10.508,8.983 10.508,9.736 v1(10.516,9.744)
  Bottom Layer w0.254: v1(8.696,6.965) 9.315,6.965 10.516,8.166 v1(10.516,9.744)
pads on no net: U1.1 U1.10 U1.11

## Polygon pours and split planes (outlines as drawn)
+3V3 on Power "NONET_L-01_P-001" (solid, pour order 1): 11.375,12.35 11.325,12.4 6.25,12.4 5.125,11.275 5.125,0.7 5.65,0.175 13.125,0.175 13.125,3.566 11.375,5.316
+3V3_M on Power "NONET_L-01_P-001" (solid, pour order 0): 12.15,10.05 12.15,6.35 12.35,6.15 22.125,6.15 22.425,6.45 22.425,12.05 22.15,12.325 12.5,12.325 12.15,11.975
GND on Top Layer "NONET_L-01_P-001" (solid, pour order 10): 0,12.5 0,0 22.5,0 22.5,12.5 21.825,12.5
NetD2_2 on Top Layer "NONET_L-01_P-001" (solid, pour order 9): 11.975,6.85 11.975,6.833 11.975,5.025 13.225,5.025 13.225,0.675 13.625,0.275 20.725,0.275 21.1,0.65 21.1,1.775 20.9,1.975 18.925,1.975 18.75,1.8 18.75,0.975 18.525,0.75 16.425,0.75 16.25,0.925 16.25,2.2 14.525,3.925 14.525,6.85 14.425,6.95 12.075,6.95
+3V3_M on Top Layer "NONET_L-01_P-001" (solid, pour order 8): 15.975,7.775 18.7,7.775 18.7,5.15 18.2,4.65 17.475,4.65 17.3,4.475 17.3,2.8 17.725,2.375 17.725,1.175 17.525,0.975 16.725,0.975 16.5,1.2 16.5,3.95 16.5,5.05 15.825,5.05 15.825,7.775
GND on Ground "NONET_L-01_P-001" (solid, pour order 3): 0,12.492 -0.001,12.492 -0.001,0 22.499,0 22.5,0 22.497,0.002 22.497,12.499 0.001,12.499 0,12.5
GND on Bottom Layer "NONET_L-01_P-001" (solid, pour order 7): 0.001,12.493 -0.006,12.486 -0.006,0.001 22.494,0.001 22.499,0.006 22.499,12.496 0.021,12.496 0,12.475

## Other copper
Top Layer:
  rectangle net +3V3: 8.85,8.05 9.65,9.325

## Silkscreen, mask and mechanical layers (free items; w line width, h text height)
Top Overlay:
  text "Q1" at 0.217,6.529 h1.5
  text "Q2" at 0.242,1.104 h1.5
Bottom Overlay:
  text "M-" at 14.985,0.125 h1.5
  text "M+" at 19.71,0.125 h1.5

## Dimensions
22.5,12.5 to 0,12.5 on Top Overlay
22.5,12.5 to 22.5,0 on Top Overlay